# Altium PCB DC-LAB-UPS-230V.PcbDoc (part 2 of 2)
Units mm, origin at the board's own origin, x right, y up, seen from the top; angles counter-clockwise.
Board outline 144.53 x 143.51 mm, 2 copper layers (Top Layer, Bottom Layer), stack 1.6 mm thick; 79 components, 50 nets, 289 pads, 57 vias.
Unrouted connection lines stored in the file: 4.
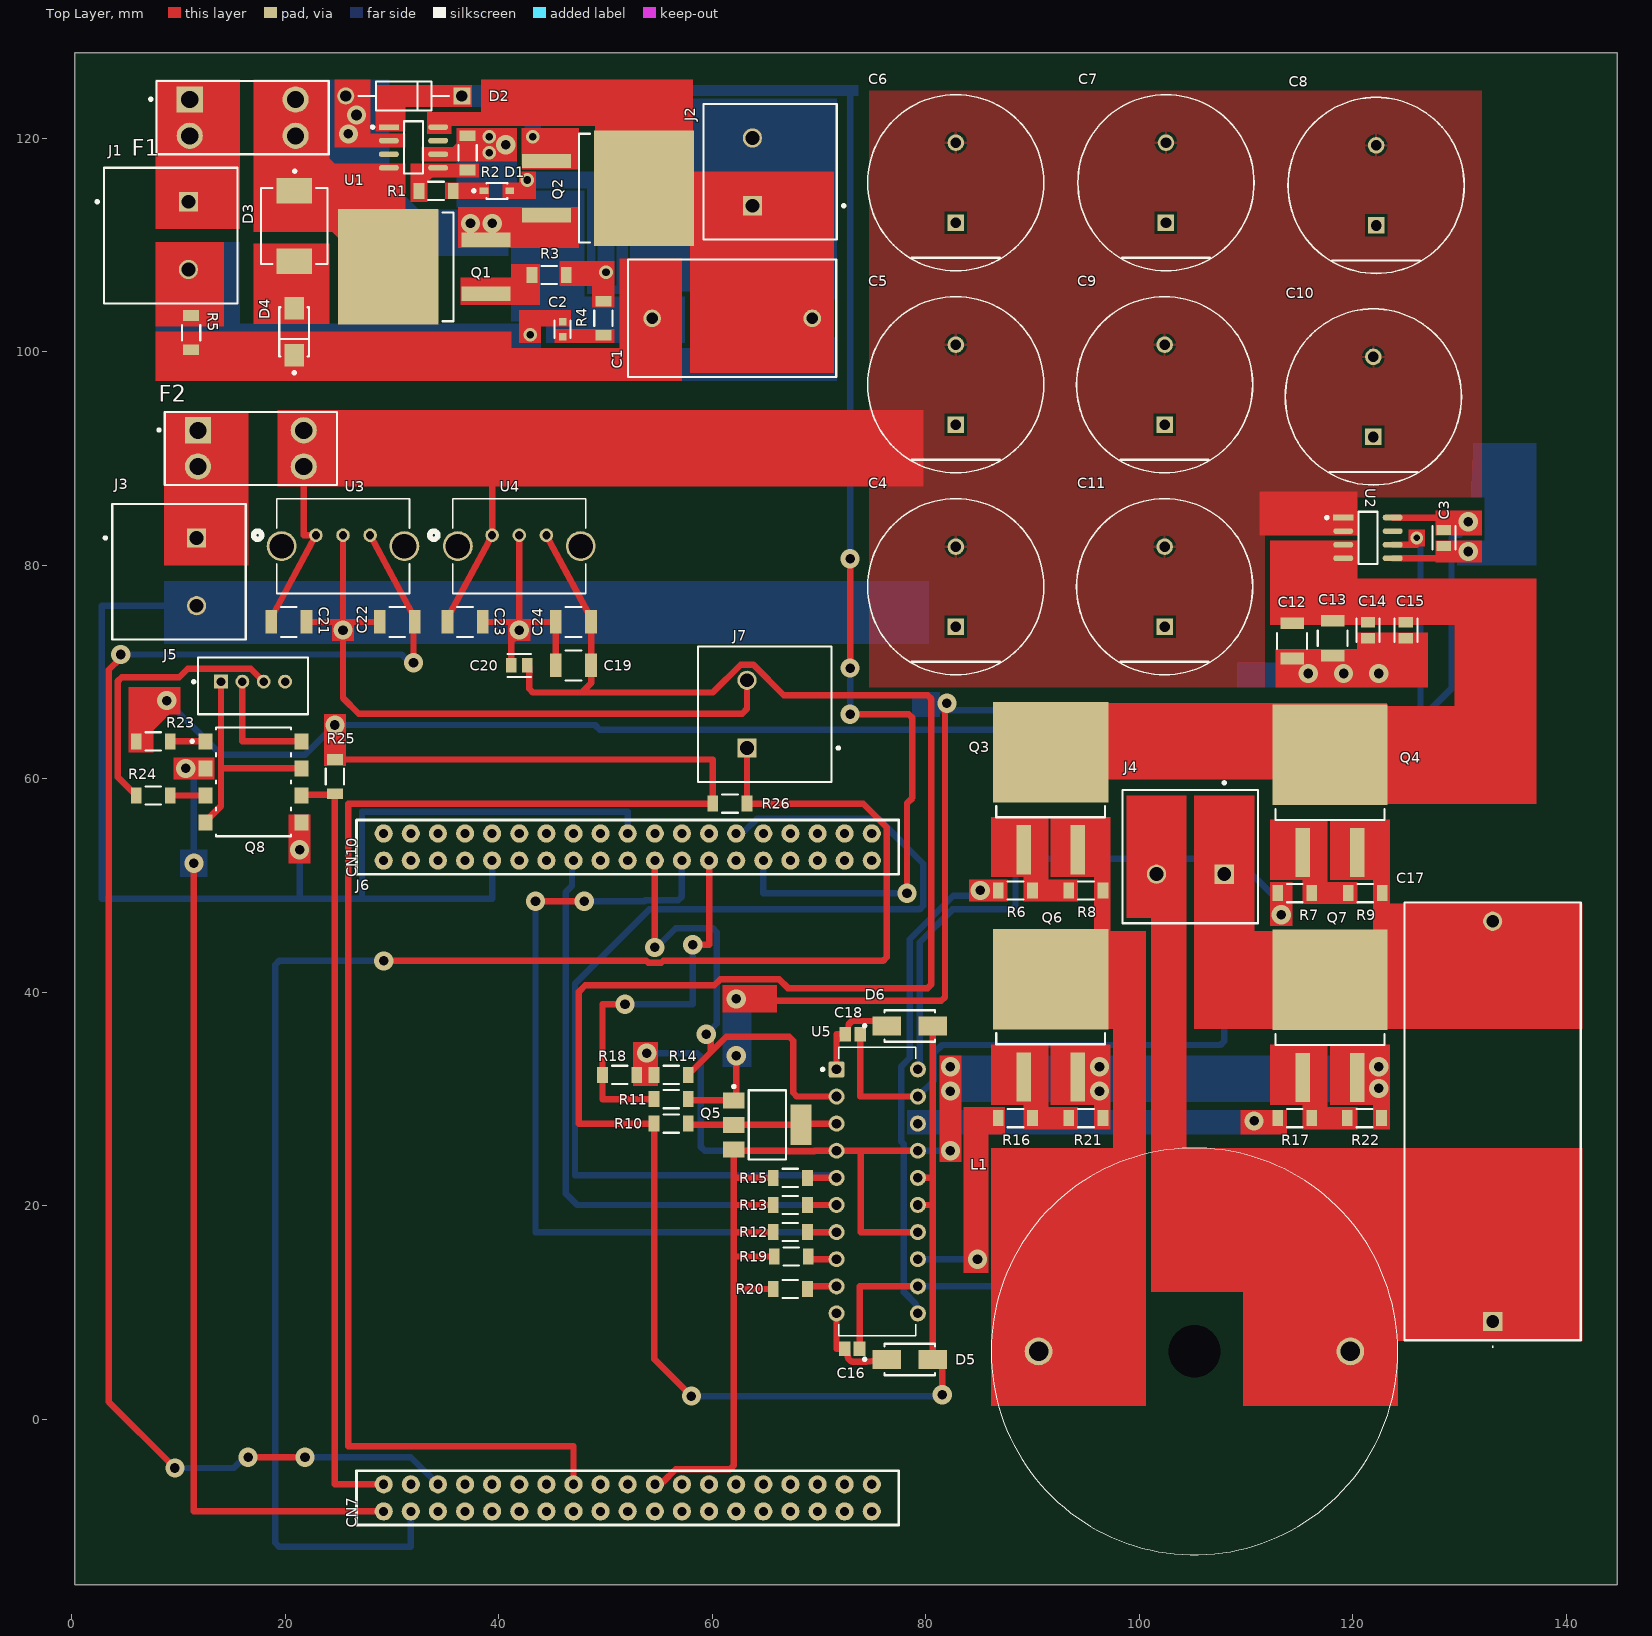
[diagram p0: Top Layer view]

## Via types
v1: diameter 1.8, hole 0.9, Top Layer to Bottom Layer, 49 vias
v2: diameter 1.27, hole 0.711, Top Layer to Bottom Layer, 6 vias
v3: diameter 1.2, hole 0.6, Top Layer to Bottom Layer, 1 vias
v4: diameter 1.8, hole 1, Top Layer to Bottom Layer, 1 vias

## Nets (pads, with @x,y where several pads share a name; then routed paths per layer and width w, separated by ;. In a path a pad name is that pad's centre, name@x,y a point inside that pad or via, vN(x,y) a via of type N, cw(c..) or ccw(c..) an arc to the next point about the centre after c; other vN are vias at no path point) (continued)
Q_BHO: (continued)
  Bottom Layer w0.6: U5.20 79.42,32.938 79.42,44.684 82.488,47.752 88.041,47.752 88.392,48.103 88.392,52.157 88.743,52.508 109.079,52.508 113.054,48.533 113.054,47.474 v1(113.284,47.244)
Q_BLO: R17.2 U5.18
  other v1: 110.744,27.94
SW_A: C16.2 L1.1 Q3.3 Q6.4 R8.2 U5.12 | length 28.7
  Top Layer w0.6: C16.2 73.79,12.446 U5.12
  Bottom Layer w0.6: U5.12 90.551,12.446 L1.1
SW_B: C17.2 C18.2 J4.1 Q4.3 Q7.4 R9.2 U5.19 | length 59.2
  Top Layer w0.6: C18.2 73.852,30.226 U5.19
  Bottom Layer w0.6: U5.19 80.726,31.704 80.726,34.265 81.513,35.052 107.599,35.052 107.95,35.403 J4.1
USART3_RX: J6.2 Q8.6 R25.2 | length 72.5
  Top Layer w0.6: Q8.6 21.607,58.509 24.549,58.509 R25.2 24.638,-6.096 J6.2
USART3_TX: J6.1 Q8.2 | length 88.1
  Top Layer w0.6: v1(11.43,52.07) 11.43,-8.636 J6.1
  Bottom Layer w0.6: v1(10.668,60.96) 11.43,60.96 v1(11.43,52.07)
VIN+: F1.1 J1.1
VIN-: C2.2 J1.2 J2.2 R5.2
  other v2: 42.926,101.6
pads on no net: J5.4 J6.4 J6.5 J6.7 J6.9 J6.10 J6.11 J6.12 J6.13 J6.14 J6.15 J6.17 J6.18 J6.21 J6.23 J6.24 J6.25 J6.26 J6.27 J6.28 J6.29 J6.30 J6.31 J6.32 J6.33 J6.34 J6.35 J6.36 J6.37 J6.38 J6.39 J6.40 J6.41 J6.42 J6.43 J6.44 J6.45 J6.46 J6.48 J6.49 J6.50 J6.51 J6.52 J6.54 J6.55 J6.56 J6.57 J6.60 J6.62 J6.64 J6.65 J6.68 J6.69 J6.70 J6.71 J6.72 J6.73 J6.74 J6.75 J6.76 L1.3 U1.3 U1.7 U2.7 U3.4 U3.5 U4.4 U4.5

## Polygon pours and split planes (outlines as drawn)
BAT_OUT- on Bottom Layer "BAT_OUT-_L02_P001" (solid, pour order 1): 74.676,124.46 74.676,68.58 111.76,68.58 111.76,86.36 132.08,86.36 132.08,124.46
NetC4_2 on Top Layer "NETC4_2_L01_P000" (solid, pour order 0): 74.676,124.46 74.676,68.58 111.76,68.58 111.76,86.36 132.08,86.36 132.08,124.46

## Other copper
Top Layer:
  region net SW_A: 91.694,56.388 91.694,50.8 95.758,50.8 95.758,48.514 97.282,48.514 97.282,56.388
  region net SW_A: 86.614,45.72 100.584,45.72 100.584,36.576 86.353,36.576
  region net SW_A: 86.106,1.27 94.488,1.27 100.584,1.27 100.584,37.338 97.536,37.338 97.536,25.4 86.106,25.4
  region net SW_A: 95.758,56.261 95.758,36.576 97.282,36.576 97.282,56.261
  region net Q_ALO: 87.376,29.21 87.376,26.67 83.566,26.67 83.566,29.21
  region net Q_ALO: 83.566,26.924 83.566,13.716 85.852,13.716 85.852,26.924
  region net BAT_OUT-: 52.578,35.306 54.864,35.306 54.864,31.242 52.578,31.242
  region net BAT_OUT-: 20.32,56.642 22.352,56.642 22.352,52.07 20.32,52.07
  region net BAT_OUT-: 24.384,74.93 24.384,72.898 26.416,72.898 26.416,74.93
  region net BAT_OUT-: 40.894,74.93 40.894,72.898 42.926,72.898 42.926,74.93
  region net BAT_OUT-: 81.28,24.13 83.312,24.13 83.312,34.036 81.28,34.036
  region net BAT_OUT-: 91.694,35.052 91.694,29.464 95.758,29.464 95.758,27.178 97.282,27.178 97.282,35.052
  region net BAT_OUT-: 117.856,35.052 117.856,29.464 121.92,29.464 121.92,27.178 123.444,27.178 123.444,35.052
  region net BAT_OUT-: 112.776,72.136 120.396,72.136 120.396,73.66 127,73.66 127,68.58 112.776,68.58
  region net BAT_OUT-: 127.762,82.296 132.08,82.296 132.08,80.264 127.762,80.264
  region net CHG_CTRL: 40.386,115.824 40.386,114.3 43.434,114.3 43.434,115.824
  region net CHG_CTRL: 41.91,115.824 41.91,116.84 43.434,116.84 43.434,115.824
  region net USART3_TX: 13.335,59.944 9.525,59.944 9.525,61.976 13.335,61.976
  region net 3V3_STM32: 127.762,82.804 127.762,85.09 132.08,85.09 132.08,82.804
  region net 3V3_STM32: 5.334,62.484 5.334,68.58 10.16,68.58 10.16,66.04 9.144,66.04 7.62,64.516 7.62,62.484
  region net 3V3_STM32: 23.622,61.214 25.654,61.214 25.654,66.04 23.622,66.04
  region net Q_AHO: 87.63,50.546 87.63,48.514 84.074,48.514 84.074,50.546
  region net FAULT_ACS: 66.04,40.64 66.04,38.1 60.96,38.1 60.96,40.64
  region net FAULT_ACS: 126.746,83.312 126.746,81.788 125.222,81.788 125.222,83.312
  region net NetC12_1: 120.904,57.658 137.16,57.658 137.16,78.74 129.54,78.74 129.54,66.802 122.428,66.802
  region net NetC12_1: 118.11,78.74 137.16,78.74 137.16,74.422 118.11,74.422
  region net NetC4_2: 19.304,94.488 19.304,87.376 79.756,87.376 79.756,94.488
  region net NetC12_1: 120.396,82.296 112.268,82.296 112.268,74.422 120.396,74.422
  region net NetC4_2: 120.396,86.868 120.396,82.804 111.252,82.804 111.252,86.868
  region net NetC12_1: 123.19,67.056 86.36,67.056 86.36,59.944 123.19,59.944
  region net Q_BHO: 112.268,50.292 112.268,46.228 114.3,46.228 114.3,50.292
  region net Q_BLO: 113.792,28.956 109.474,28.956 109.474,26.67 113.792,26.67
  region net SW_B: 121.92,48.26 141.478,48.26 141.478,36.576 121.92,36.576 121.92,37.084
  region net NetC17_1: 115.57,25.4 141.478,25.4 141.478,7.366 115.57,7.366
  region net SW_B: 105.156,47.752 105.156,36.576 114.554,36.576 114.554,45.72 110.744,45.72 110.744,47.752
  region net NetC17_1: 101.092,47.244 101.092,11.938 109.728,11.938 109.728,1.27 124.206,1.27 124.206,25.4 104.394,25.4 104.394,47.244
  region net NetC17_1: 98.806,58.42 104.394,58.42 104.394,46.99 98.806,46.99 98.806,47.244
  region net SW_B: 105.156,58.42 110.744,58.42 110.744,46.99 105.156,46.99
  region net NetQ3_1: 86.106,56.388 91.44,56.388 91.44,48.514 89.154,48.514 89.154,50.8 86.106,50.8
  region net NetQ3_1: 94.234,50.546 94.234,48.514 90.297,48.514 90.297,50.546 90.424,50.546
  region net SW_B: 121.92,56.134 121.92,36.576 123.444,36.576 123.444,56.134
  region net NetQ4_1: 112.268,56.134 117.602,56.134 117.602,48.26 115.316,48.26 115.316,50.546 112.268,50.546
  region net SW_B: 117.856,56.134 117.856,50.546 121.92,50.546 121.92,48.26 123.444,48.26 123.444,56.134
  region net NetQ4_1: 120.396,50.292 120.396,48.26 116.459,48.26 116.459,50.292 116.586,50.292
  region net NetQ6_1: 86.106,35.052 91.44,35.052 91.44,27.178 89.154,27.178 89.154,29.464 86.106,29.464
  region net NetQ6_1: 94.234,29.21 94.234,27.178 90.297,27.178 90.297,29.21 90.424,29.21
  region net NetQ7_1: 120.396,29.21 120.396,27.178 116.459,27.178 116.459,29.21 116.586,29.21
  region net NetQ7_1: 112.268,35.052 117.602,35.052 117.602,27.178 115.316,27.178 115.316,29.464 112.268,29.464
  region net BAT_OUT+: 8.636,94.234 16.51,94.234 16.51,80.01 8.636,80.01
  region net VIN+: 7.874,125.476 15.748,125.476 15.748,111.506 7.874,111.506
  region net NetD3_1: 17.018,125.476 24.13,125.476 24.13,111.252 17.018,111.252
  region net NetD3_1: 31.242,117.602 23.622,117.602 23.622,111.252 31.242,111.252
  region net NetD3_1: 24.384,111.252 25.146,110.49 25.146,111.506
  region net NetD3_1: 24.13,118.11 24.638,117.602 24.13,117.602
  region net NetD2_1: 48.768,106.172 48.768,104.14 50.8,104.14 50.8,106.172
  region net NetQ1_1: 41.148,106.934 41.148,108.204 43.815,108.204 43.815,106.934
  region net BAT_IN+: 49.022,109.982 59.182,109.982 59.182,116.84 49.022,116.84
  region net BAT_IN+: 57.912,116.84 71.374,116.84 71.374,98.044 57.912,98.044
  region net BAT_IN+: 33.274,120.396 33.274,122.428 38.354,122.428 38.354,125.476 58.166,125.476 58.166,109.982 49.022,109.982 49.022,121.158 40.894,121.158 35.56,121.158 35.56,120.396
  region net NetD2_2: 36.195,113.538 36.195,109.728 47.498,109.728 47.498,113.538
  region net NetD2_2: 24.638,120.396 24.638,119.126 27.94,119.126 31.242,119.126 31.242,120.396
  region net NetD2_2: 24.638,120.142 24.638,125.476 27.94,125.476 27.94,120.142
  region net NetD2_1: 45.72,108.458 50.8,108.458 50.8,106.172 45.72,106.172
  region net NetD2_1: 42.164,120.904 42.164,117.856 42.164,117.094 47.498,117.094 47.498,120.904
  region net NetD2_1: 28.448,121.666 28.448,124.968 37.465,124.968 37.465,122.936 31.242,122.936 31.242,121.666
  region net NetD2_1: 31.242,120.65 28.448,120.65 28.448,121.666 31.242,121.666
  region net NetC2_1: 45.212,102.108 50.8,102.108 50.8,100.838 45.212,100.838
  region net NetC1_2: 51.308,100.33 41.148,100.33 41.148,101.854 24.13,101.854 24.13,97.282 57.15,97.282 57.15,100.33
  region net NetC1_2: 51.308,108.712 57.15,108.712 57.15,97.536 51.308,97.536
  region net NetC1_2: 36.068,119.507 35.687,119.126 36.068,119.126
  region net NetC1_2: 24.13,101.854 7.874,101.854 7.874,97.282 24.13,97.282
  region net NetC1_2: 35.306,119.126 36.068,119.126 36.068,120.904 41.656,120.904 41.656,117.856 35.306,117.856
  region net NetC1_2: 32.766,117.856 35.306,117.856 35.306,119.126 32.766,119.126
  region net VIN-: 43.942,102.362 43.942,100.838 41.91,100.838 41.91,102.362
  region net NetQ1_1: 36.449,104.394 36.449,106.934 43.815,106.934 43.815,104.394
  region net VIN-: 46.736,102.362 41.91,102.362 41.91,103.886 46.736,103.886
  region net VIN-: 7.874,102.362 14.224,102.362 14.224,110.236 7.874,110.236
  region net NetD3_2: 17.018,102.616 24.13,102.616 24.13,110.109 17.018,110.109
  region net NetR1_2: 35.306,117.602 38.1,117.602 38.1,116.332 33.782,116.332
  region net NetR1_2: 35.306,117.602 31.75,117.602 31.75,114.046 33.274,114.046 33.274,115.951 34.121,116.586 35.306,116.586
  region net NetD1_1: 34.982,115.824 34.982,114.3 39.046,114.3 39.046,115.824
Bottom Layer:
  region net BAT_OUT-: 8.636,78.486 8.636,72.644 80.264,72.644 80.264,78.486
  region net BAT_OUT-: 81.28,34.036 81.28,29.718 123.444,29.718 123.444,34.036
  region net BAT_OUT-: 123.952,70.866 123.952,68.58 109.22,68.58 109.22,70.866 109.982,70.866
  region net BAT_OUT-: 129.794,82.296 129.794,80.01 137.16,80.01 137.16,91.44 132.334,91.44 132.334,82.296
  region net BAT_OUT-: 131.318,91.44 133.35,91.44 133.35,86.36 131.064,86.36
  region net CHG_CTRL: 41.91,116.84 41.91,115.316 48.26,115.316 48.26,105.41 52.07,105.41 52.07,123.952 73.66,123.952 73.66,124.968 51.054,124.968 51.054,106.172 49.022,106.172 49.022,116.84
  region net USART3_TX: 10.16,50.8 10.16,53.34 12.7,53.34 12.7,50.8
  region net FAULT_ACS: 60.96,40.64 63.627,40.64 63.627,33.02 60.96,33.02
  region net FAULT_ACS: 81.28,68.072 78.74,68.072 78.74,65.786 81.28,65.786
  region net NetD2_1: 35.56,124.968 35.56,122.936 42.418,122.936 42.418,119.38 43.942,119.38 43.942,124.968
  region net VIN-: 43.942,100.33 58.166,100.33 58.166,108.966 65.532,108.966 65.532,115.316 52.324,115.316 52.324,123.698 71.628,123.698 71.628,104.902 67.564,104.902 67.564,97.282 43.942,97.282
  region net VIN-: 61.976,115.316 61.976,111.76 65.532,111.76 65.532,108.966 58.166,108.966 58.166,105.664 52.324,105.664 52.324,115.316
  region net Q_BLO: 112.014,28.956 112.014,26.67 78.232,26.67 78.232,28.956
  region net NetD2_2: 23.876,125.476 29.718,125.476 29.718,116.078 32.512,113.284 40.894,113.284 40.894,108.966 28.194,108.966 23.876,113.284
  region net NetD2_1: 43.942,124.968 50.8,124.968 50.8,106.426 49.276,106.426 49.276,122.936 43.942,122.936
  region net VIN-: 67.564,101.346 71.628,101.346 71.628,97.282 67.564,97.282
  region net VIN-: 15.748,110.236 15.748,102.616 43.688,102.616 43.942,102.362 43.942,97.282 7.874,97.282 7.874,101.854 7.874,110.236
  region net NetC1_2: 36.068,120.904 36.068,113.538 41.148,113.538 41.148,102.87 43.942,102.87 44.45,102.362 44.45,100.838 57.404,100.838 57.404,105.156 48.006,105.156 48.006,115.062 41.656,115.062 41.656,120.904

## Text inside footprints (layer, text, board x,y; h text height)
J6: Top Overlay "CN7" at 26.67,-10.166 h1 r90; Top Overlay "CN10" at 26.67,50.784 h1 r90